# Altium PCB RK839.PcbDoc (part 1 of 3)
Units mm, origin at the board's own origin, x right, y up, seen from the top; angles counter-clockwise.
Board outline 303.12 x 189.36 mm, 2 copper layers (TopLayer, BottomLayer); 307 components, 971 nets, 714 pads, 1012 vias.
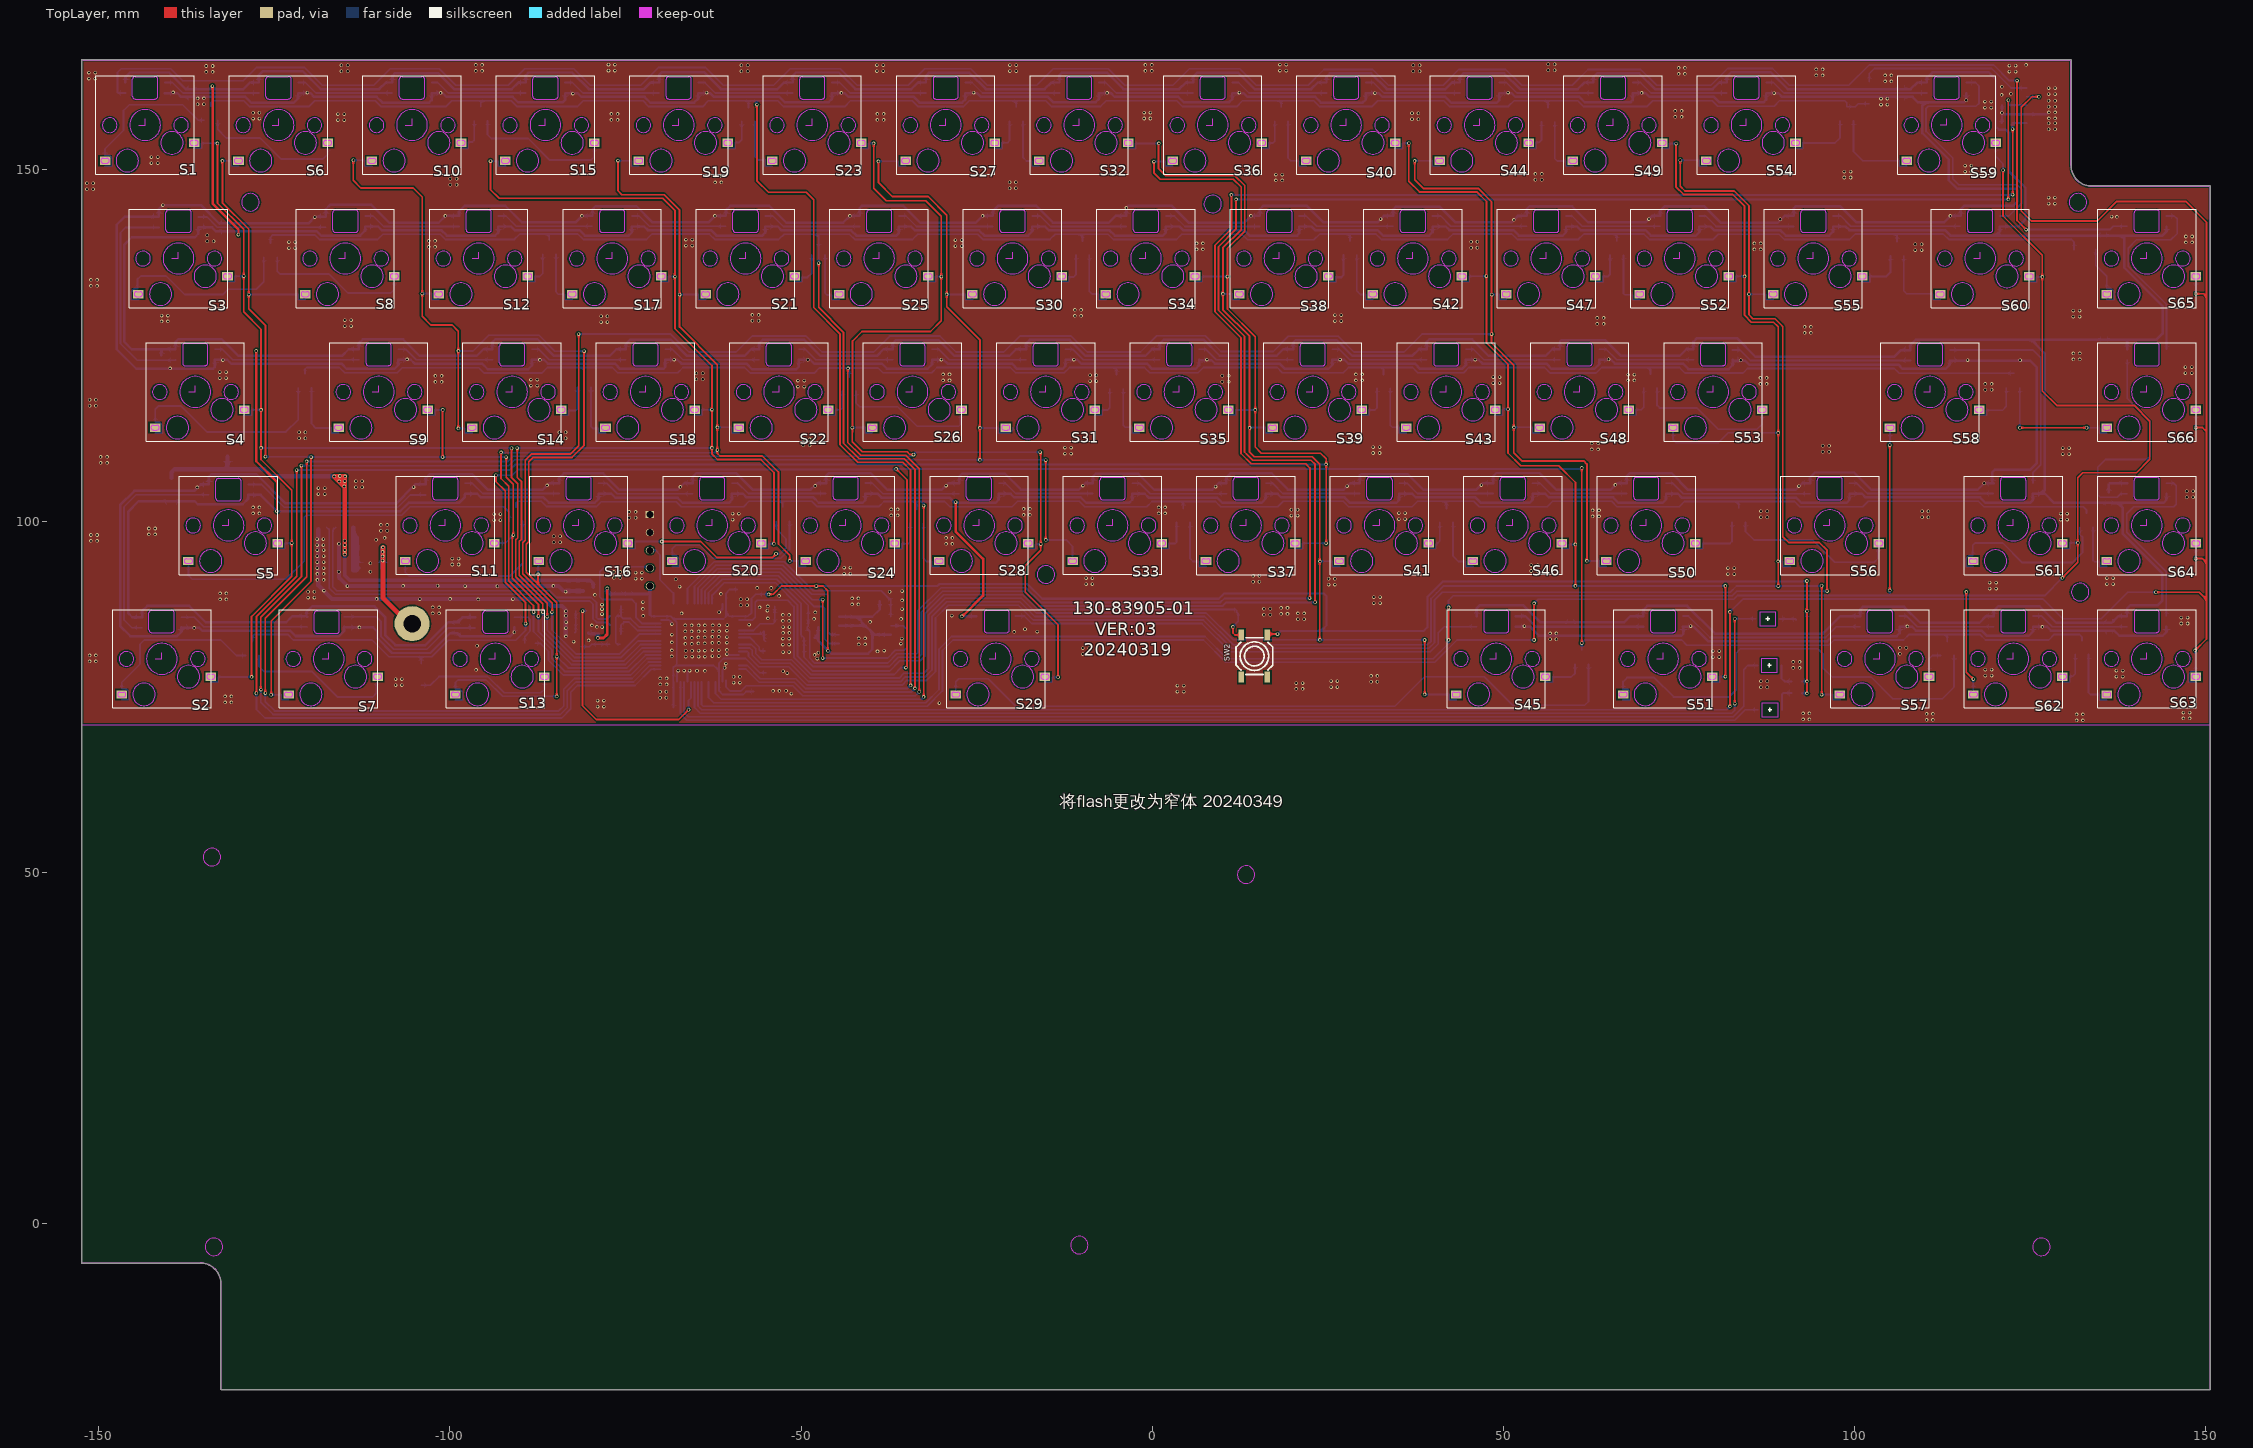
[diagram p0: TopLayer view]
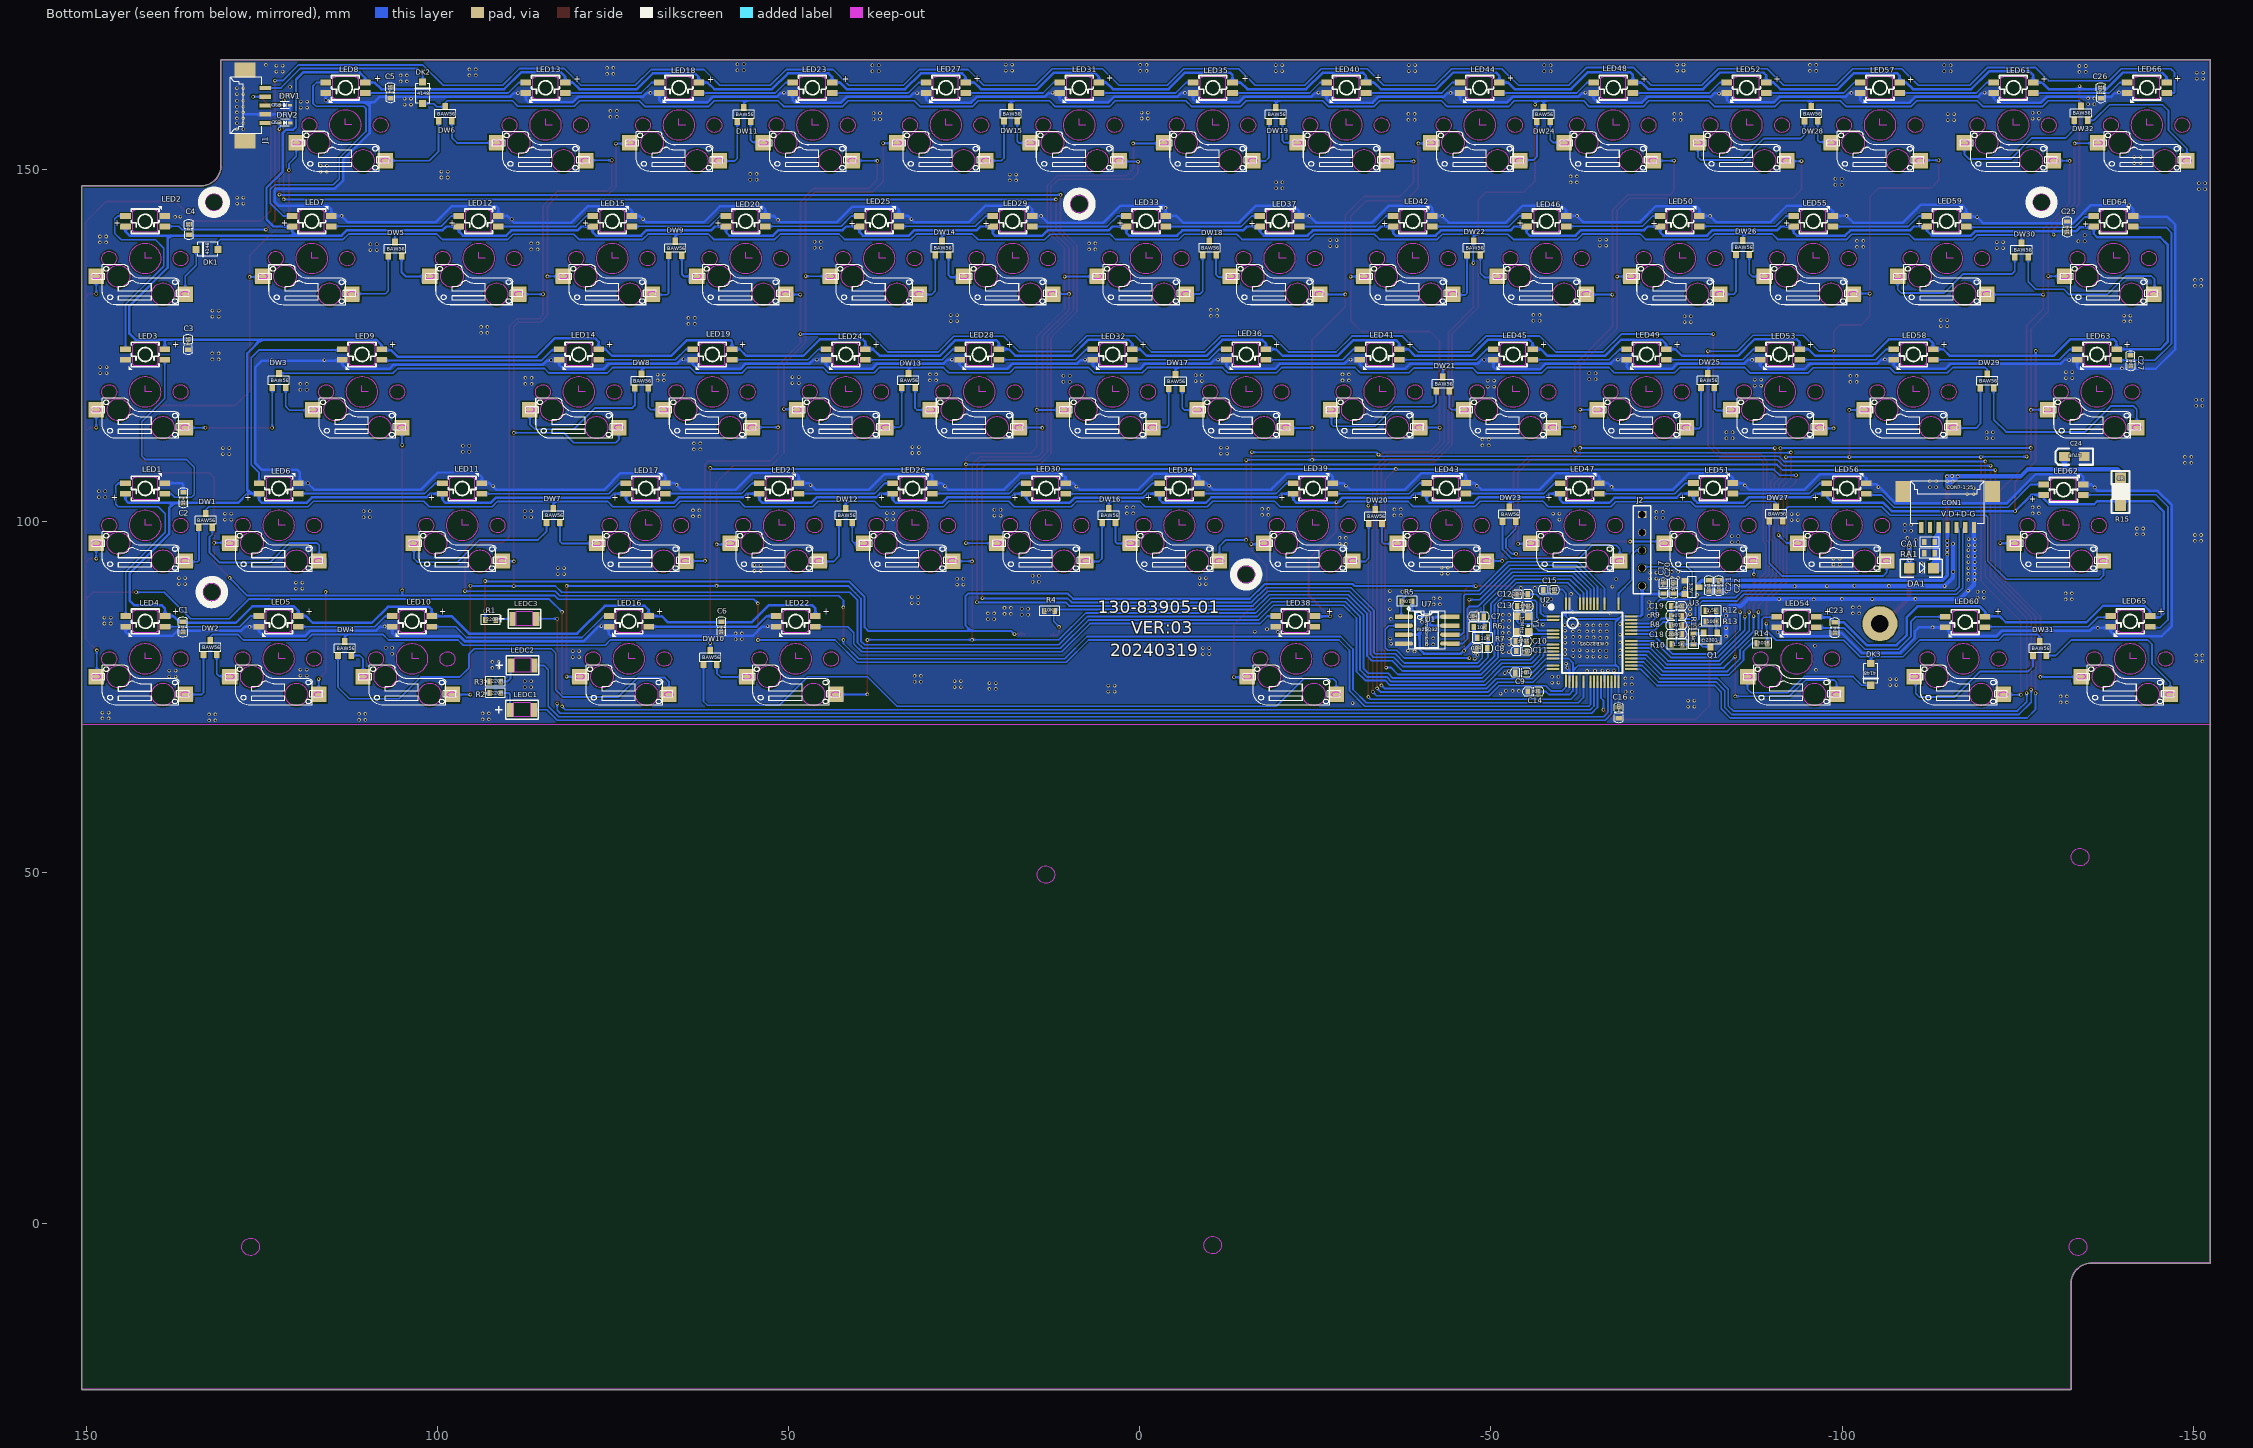
[diagram p1: BottomLayer view, seen from below]

## Layer stack, top to bottom
TopSolder: solder mask 0.0102, Solder Resist, Dk 3.5
TopLayer: signal copper 0.0356
Dielectric1: core 0.32, FR-4, Dk 4.8
BottomLayer: signal copper 0.0356
BottomSolder: solder mask 0.0102, Solder Resist, Dk 3.5

## Board outline
-152.394,-5.651 -135.553,-5.651 cw(c-135.553,-8.588) -132.617,-8.588 ccw(c-132.553,-8.588) -132.617,-8.588 -132.617,-23.578 ccw(c-132.553,-23.578) -132.553,-23.642 150.599,-23.642 ccw(c150.599,-23.578) 150.663,-23.578 150.663,71.036 150.663,147.66 ccw(c150.599,147.66) 150.599,147.724 133.758,147.724 cw(c133.758,150.66) 130.822,150.66 ccw(c130.758,150.66) 130.822,150.66 130.822,165.651 ccw(c130.758,165.651) 130.758,165.714 -152.394,165.714 ccw(c-152.394,165.651) -152.457,165.651 -152.457,71.036 ccw(c-152.394,71.036) -152.457,71.036 cw(c-152.394,71.036) -152.457,71.036 cw(c-152.394,71.036) -152.457,71.037 -152.457,71.036 -152.457,-5.588 ccw(c-152.394,-5.588)

## Design rules (kind name [scope] priority, off if disabled: settings)
Clearance Clearance_2 [All] p1: gap=0.2 ignorepadtopadclearanceinfootprint=FALSE
FabricationTestPointUsage TestPointUsage [All] p1: valid=0 allowmultiple=FALSE
FabricationTestpoint Testpoint [All] p1: side=3 testpointundercomponent=TRUE minsize=1.016 maxsize=2.54 preferedsize=1.524 minholesize=0.508 maxholesize=1.016 preferedholesize=0.813 testpointgrid=0.025 allowsidetop=TRUE allowsidebottom=TRUE usegrid=TRUE gridtolerance=0
NetAntennae [All] p1: netantennaetolerance=0.1
PolygonConnect PolygonConnect_1 [All] p1: connectstyle=Direct reliefconductorwidth=0.4 reliefentries=4 polygonreliefangle="90 Angle" airgapwidth=0.254
RoutingVias [All] p1: holewidth=0.3 width=0.5 viastyle="Through Hole" minholewidth=0.1 minwidth=0.1 maxholewidth=2 maxwidth=2
SolderMaskExpansion [All] p1: expansion=0.102
UnRoutedNet [All] p1: checkbadconnections=TRUE
Width [All] p1: maxlimit=2 minlimit=0.25 preferedwidth=0.25
26 further rules are at their usual default settings.

## Components (designator, comment, footprint, x,y, rotation, side; value= is the part's Value field where it differs from the comment)
@1 "FPAD_1" FPAD_1 -228.674,-368.184 r270 top locked
@2 "FPAD_1" FPAD_1 -228.674,-368.176 r270 top locked
@3 "FPAD_1" FPAD_1 -228.674,-366.076 r270 top locked
@4 "FPAD_1" FPAD_1 -228.674,-366.076 r270 top locked
@5 "FPAD_1" FPAD_1 -228.628,-384.706 r270 top locked
@6 "FPAD_1" FPAD_1 -228.628,-384.698 r270 top locked
@7 "FPAD_1" FPAD_1 -228.628,-382.598 r270 top locked
@8 "FPAD_1" FPAD_1 -228.628,-382.598 r270 top locked
@9 "FPAD_1" FPAD_1 -228.506,-400.044 r270 top locked
@10 "FPAD_1" FPAD_1 -228.506,-400.035 r270 top locked
@11 "FPAD_1" FPAD_1 -228.506,-397.935 r270 top locked
@12 "FPAD_1" FPAD_1 -228.506,-397.935 r270 top locked
@13 "FPAD_1" FPAD_1 -228.502,-351.984 r270 top locked
@14 "FPAD_1" FPAD_1 -228.502,-351.975 r270 top locked
@15 "FPAD_1" FPAD_1 -228.502,-349.875 r270 top locked
@16 "FPAD_1" FPAD_1 -228.502,-349.875 r270 top locked
@17 "FPAD_1" FPAD_1 -228.448,-416.529 r270 top locked
@18 "FPAD_1" FPAD_1 -228.448,-416.521 r270 top locked
@19 "FPAD_1" FPAD_1 -228.448,-414.421 r270 top locked
@20 "FPAD_1" FPAD_1 -228.448,-414.421 r270 top locked
@21 "FPAD_1" FPAD_1 -226.595,-368.184 r270 top locked
@22 "FPAD_1" FPAD_1 -226.574,-368.176 r270 top locked
@23 "FPAD_1" FPAD_1 -226.574,-366.076 r270 top locked
@24 "FPAD_1" FPAD_1 -226.574,-366.076 r270 top locked
@25 "FPAD_1" FPAD_1 -226.549,-384.706 r270 top locked
@26 "FPAD_1" FPAD_1 -226.528,-384.698 r270 top locked
@27 "FPAD_1" FPAD_1 -226.528,-382.598 r270 top locked
@28 "FPAD_1" FPAD_1 -226.528,-382.598 r270 top locked
@29 "FPAD_1" FPAD_1 -226.427,-400.044 r270 top locked
@30 "FPAD_1" FPAD_1 -226.424,-351.984 r270 top locked
@31 "FPAD_1" FPAD_1 -226.406,-400.035 r270 top locked
@32 "FPAD_1" FPAD_1 -226.406,-397.935 r270 top locked
@33 "FPAD_1" FPAD_1 -226.406,-397.935 r270 top locked
@34 "FPAD_1" FPAD_1 -226.402,-351.975 r270 top locked
@35 "FPAD_1" FPAD_1 -226.402,-349.875 r270 top locked
@36 "FPAD_1" FPAD_1 -226.402,-349.875 r270 top locked
@37 "FPAD_1" FPAD_1 -226.369,-416.529 r270 top locked
@38 "FPAD_1" FPAD_1 -226.348,-416.521 r270 top locked
@39 "FPAD_1" FPAD_1 -226.348,-414.421 r270 top locked
@40 "FPAD_1" FPAD_1 -226.348,-414.421 r270 top locked
@41 "FPAD_1" FPAD_1 113.329,-399.076 r270 top locked
@42 "FPAD_1" FPAD_1 113.329,-399.068 r270 top locked
@43 "FPAD_1" FPAD_1 113.329,-396.968 r270 top locked
@44 "FPAD_1" FPAD_1 113.329,-396.968 r270 top locked
@45 "FPAD_1" FPAD_1 113.333,-367.252 r270 top locked
@46 "FPAD_1" FPAD_1 113.333,-367.244 r270 top locked
@47 "FPAD_1" FPAD_1 113.333,-365.144 r270 top locked
@48 "FPAD_1" FPAD_1 113.333,-365.144 r270 top locked
@49 "FPAD_1" FPAD_1 113.366,-415.586 r270 top locked
@50 "FPAD_1" FPAD_1 113.366,-415.578 r270 top locked
@51 "FPAD_1" FPAD_1 113.366,-413.478 r270 top locked
@52 "FPAD_1" FPAD_1 113.366,-413.478 r270 top locked
@53 "FPAD_1" FPAD_1 113.379,-383.774 r270 top locked
@54 "FPAD_1" FPAD_1 113.379,-383.765 r270 top locked
@55 "FPAD_1" FPAD_1 113.379,-381.665 r270 top locked
@56 "FPAD_1" FPAD_1 113.379,-381.665 r270 top locked
@57 "FPAD_1" FPAD_1 113.505,-351.051 r270 top locked
@58 "FPAD_1" FPAD_1 113.505,-351.043 r270 top locked
@59 "FPAD_1" FPAD_1 113.505,-348.943 r270 top locked
@60 "FPAD_1" FPAD_1 113.505,-348.943 r270 top locked
@61 "FPAD_1" FPAD_1 115.408,-399.076 r270 top locked
@62 "FPAD_1" FPAD_1 115.412,-367.252 r270 top locked
@63 "FPAD_1" FPAD_1 115.429,-399.068 r270 top locked
@64 "FPAD_1" FPAD_1 115.429,-396.968 r270 top locked
@65 "FPAD_1" FPAD_1 115.429,-396.968 r270 top locked
@66 "FPAD_1" FPAD_1 115.433,-367.244 r270 top locked
@67 "FPAD_1" FPAD_1 115.433,-365.144 r270 top locked
@68 "FPAD_1" FPAD_1 115.433,-365.144 r270 top locked
@69 "FPAD_1" FPAD_1 115.444,-415.586 r270 top locked
@70 "FPAD_1" FPAD_1 115.458,-383.774 r270 top locked
@71 "FPAD_1" FPAD_1 115.466,-415.578 r270 top locked
@72 "FPAD_1" FPAD_1 115.466,-413.478 r270 top locked
@73 "FPAD_1" FPAD_1 115.466,-413.478 r270 top locked
@74 "FPAD_1" FPAD_1 115.479,-383.765 r270 top locked
@75 "FPAD_1" FPAD_1 115.479,-381.665 r270 top locked
@76 "FPAD_1" FPAD_1 115.479,-381.665 r270 top locked
@77 "FPAD_1" FPAD_1 115.583,-351.051 r270 top locked
@78 "FPAD_1" FPAD_1 115.605,-351.043 r270 top locked
@79 "FPAD_1" FPAD_1 115.605,-348.943 r270 top locked
@80 "FPAD_1" FPAD_1 115.605,-348.943 r270 top locked
C1 "104" 0603C#1 136.231,84.925 r270 bottom locked
C2 "104" 0603C#1 136.15,103.325 r270 bottom locked
C3 "104" 0603C#1 135.5,125.151 r90 bottom locked
C4 "104" 0603C#1 135.375,141.525 r90 bottom locked
C5 "104" 0603C#1 106.675,160.988 r90 bottom locked
C6 "104" 0603C#1 59.55,84.94 r270 bottom
C7 "104" 0603C#1 -48.251,86.393 r180 bottom locked
C8 "104" 0603C#1 -48.751,81.893 r180 bottom locked
C9 "104" 0603C#2 -54.238,78.425 r0 bottom locked
C10 "10pF" 0603C#1 -54.325,82.9 r180 bottom locked
C11 "104" 0603C#1 -54.35,81.5 r0 bottom locked
C12 "104" 0603C#1 -54.5,89.575 r180 bottom locked
C13 "10pF" 0603C#1 -54.525,87.875 r0 bottom locked
C14 "104" 0603C#1 -56.013,75.725 r180 bottom locked
C15 "104" 0603C#1 -58.25,90.2 r0 bottom locked
C16 "104" 0603C#1 -68.2,72.713 r90 bottom locked
C17 "104" 0603C#1 -74.56,90.46 r90 bottom locked
C18 "20PF" 0603C#1 -76.417,83.89 r0 bottom locked
C19 "20PF" 0603C#1 -76.417,87.9 r0 bottom locked
C20 "10UF" 0603C#1 -76,90.48 r90 bottom locked
C21 "104" 0603C#1 -81.05,90.8 r90 bottom locked
C22 "10UF" 0603C#1 -82.45,90.8 r90 bottom locked
C23 "104" 0603C#1 -98.95,84.825 r270 bottom locked
C24 "47UF" CAP-SMT-3216-1 -133.075,109.175 r0 bottom locked
C25 "104" 0603C#1 -132.075,141.9 r270 bottom locked
C26 "104" 0603C#1 -136.85,160.975 r90 bottom locked
C27 "104" 0603C#1 -141.075,122.825 r270 bottom locked
CA1 "103" 0603R/2 -112.452,97.029 r180 bottom locked
CON1 "CON7-1.25" "1.25MM 7PIN" -115.025,99.1 r180 bottom locked
DA1 "SS14" D1206 -113,93.3 r0 bottom locked
DK1 "4148" SOD123-A 132.8,138.675 r90 bottom locked
DK2 "4148" SOD123-A 102.1,161 r180 bottom locked
DK3 "4148" SOD123-A -104.1,78.175 r0 bottom locked
DRV1 "ESD" SOD-523_L1.2-W0.8-LS1.6-BI 121.725,159.225 r0 bottom locked
DRV2 "ESD" SOD-523_L1.2-W0.8-LS1.6-BI 121.7,156.7 r0 bottom locked
DW1 "BAW56" SOT-23#1 133,100.12 r0 bottom locked
DW2 "BAW56" SOT-23#1 132.35,82 r0 bottom locked
DW3 "BAW56" SOT-23#1 122.55,120 r0 bottom locked
DW4 "BAW56" SOT-23#1 113.195,81.875 r0 bottom locked
DW5 "BAW56" SOT-23#1 106.025,138.775 r0 bottom locked
DW6 "BAW56" SOT-23#1 98.875,158 r0 bottom locked
DW7 "BAW56" SOT-23#1 83.5,100.825 r0 bottom locked
DW8 "BAW56" SOT-23#1 70.925,119.95 r0 bottom locked
DW9 "BAW56" SOT-23#1 66.125,138.85 r0 bottom locked
DW10 "BAW56" SOT-23#1 61.15,80.6 r0 bottom locked
DW11 "BAW56" SOT-23#1 56.35,157.875 r0 bottom locked
DW12 "BAW56" SOT-23#1 41.875,100.8 r0 bottom locked
DW13 "BAW56" SOT-23#1 32.925,120 r0 bottom locked
DW14 "BAW56" SOT-23#1 28.15,138.875 r0 bottom locked
DW15 "BAW56" SOT-23#1 18.375,157.95 r0 bottom locked
DW16 "BAW56" SOT-23#1 4.4,100.8 r0 bottom locked
DW17 "BAW56" SOT-23#1 -5.1,119.85 r0 bottom locked
DW18 "BAW56" SOT-23#1 -9.925,138.875 r0 bottom locked
DW19 "BAW56" SOT-23#1 -19.375,157.925 r0 bottom locked
DW20 "BAW56" SOT-23#1 -33.55,100.65 r0 bottom locked
DW21 "BAW56" SOT-23#1 -43.15,119.525 r0 bottom locked
DW22 "BAW56" SOT-23#1 -47.55,138.9 r0 bottom locked
DW23 "BAW56" SOT-23#1 -52.6,100.975 r0 bottom locked
DW24 "BAW56" SOT-23#1 -57.5,157.9 r0 bottom locked
DW25 "BAW56" SOT-23#1 -80.875,120.025 r0 bottom locked
DW26 "BAW56" SOT-23#1 -85.85,138.975 r0 bottom locked
DW27 "BAW56" SOT-23#1 -90.601,101.026 r0 bottom locked
DW28 "BAW56" SOT-23#1 -95.6,158 r0 bottom locked
DW29 "BAW56" SOT-23#1 -120.65,119.975 r0 bottom locked
DW30 "BAW56" SOT-23#1 -125.55,138.575 r0 bottom locked
DW31 "BAW56" SOT-23#1 -128.13,81.875 r0 bottom locked
DW32 "BAW56" SOT-23#1 -134.025,158.075 r0 bottom locked
J1 "5P" RGBC6 124.5,159.175 r90 bottom locked
J2 "SIP5_2.54" SIP5_2.54 -71.525,100.92 r270 bottom locked
LED1 "Comment" 3528反贴幻彩RGB-2.5mA 141.6,104.65 r0 bottom locked
LED2 "Comment" 3528反贴幻彩RGB-2.5mA 141.6,142.7 r0 bottom locked
LED3 "Comment" 3528反贴幻彩RGB-2.5mA 141.6,123.725 r180 bottom locked
LED4 "Comment" 3528反贴幻彩RGB-2.5mA 141.575,85.725 r180 bottom locked
LED5 "Comment" 3528反贴幻彩RGB-2.5mA 122.589,85.725 r180 bottom locked
LED6 "Comment" 3528反贴幻彩RGB-2.5mA 122.58,104.65 r0 bottom locked
LED7 "Comment" 3528反贴幻彩RGB-2.5mA 117.875,142.7 r0 bottom locked
LED8 "Comment" 3528反贴幻彩RGB-2.5mA 113.094,161.7 r180 bottom locked
LED9 "Comment" 3528反贴幻彩RGB-2.5mA 110.723,123.725 r180 bottom locked
LED10 "Comment" 3528反贴幻彩RGB-2.5mA 103.598,85.725 r180 bottom locked
LED11 "Comment" 3528反贴幻彩RGB-2.5mA 96.465,104.65 r0 bottom locked
LED12 "Comment" 3528反贴幻彩RGB-2.5mA 94.125,142.7 r0 bottom locked
LED13 "Comment" 3528反贴幻彩RGB-2.5mA 84.599,161.7 r180 bottom locked
LED14 "Comment" 3528反贴幻彩RGB-2.5mA 79.843,123.725 r180 bottom locked
LED15 "Comment" 3528反贴幻彩RGB-2.5mA 75.1,142.7 r0 bottom locked
LED16 "Comment" 3528反贴幻彩RGB-2.5mA 72.725,85.725 r180 bottom locked
LED17 "Comment" 3528反贴幻彩RGB-2.5mA 70.337,104.65 r0 bottom locked
LED18 "Comment" 3528反贴幻彩RGB-2.5mA 65.589,161.7 r180 bottom locked
LED19 "Comment" 3528反贴幻彩RGB-2.5mA 60.848,123.725 r180 bottom locked
LED20 "Comment" 3528反贴幻彩RGB-2.5mA 56.1,142.7 r0 bottom locked
LED21 "Comment" 3528反贴幻彩RGB-2.5mA 51.339,104.65 r0 bottom locked
LED22 "Comment" 3528反贴幻彩RGB-2.5mA 48.975,85.725 r180 bottom locked
LED23 "Comment" 3528反贴幻彩RGB-2.5mA 46.599,161.7 r180 bottom locked
LED24 "Comment" 3528反贴幻彩RGB-2.5mA 41.843,123.725 r180 bottom locked
LED25 "Comment" 3528反贴幻彩RGB-2.5mA 37.1,142.7 r0 bottom locked
LED26 "Comment" 3528反贴幻彩RGB-2.5mA 32.35,104.65 r0 bottom locked
LED27 "Comment" 3528反贴幻彩RGB-2.5mA 27.599,161.7 r180 bottom locked
LED28 "Comment" 3528反贴幻彩RGB-2.5mA 22.84,123.725 r180 bottom locked
LED29 "Comment" 3528反贴幻彩RGB-2.5mA 18.1,142.7 r0 bottom locked
LED30 "Comment" 3528反贴幻彩RGB-2.5mA 13.35,104.65 r0 bottom locked
LED31 "Comment" 3528反贴幻彩RGB-2.5mA 8.599,161.7 r180 bottom locked
LED32 "Comment" 3528反贴幻彩RGB-2.5mA 3.853,123.725 r180 bottom locked
LED33 "Comment" 3528反贴幻彩RGB-2.5mA -0.9,142.7 r0 bottom locked
LED34 "Comment" 3528反贴幻彩RGB-2.5mA -5.65,104.65 r0 bottom locked
LED35 "Comment" 3528反贴幻彩RGB-2.5mA -10.412,161.7 r180 bottom locked
LED36 "Comment" 3528反贴幻彩RGB-2.5mA -15.16,123.725 r180 bottom locked
LED37 "Comment" 3528反贴幻彩RGB-2.5mA -19.9,142.7 r0 bottom locked
LED38 "Comment" 3528反贴幻彩RGB-2.5mA -22.15,85.725 r180 bottom locked
LED39 "Comment" 3528反贴幻彩RGB-2.5mA -24.675,104.65 r0 bottom locked
LED40 "Comment" 3528反贴幻彩RGB-2.5mA -29.421,161.7 r180 bottom locked
LED41 "Comment" 3528反贴幻彩RGB-2.5mA -34.157,123.725 r180 bottom locked
LED42 "Comment" 3528反贴幻彩RGB-2.5mA -38.875,142.7 r0 bottom locked
LED43 "Comment" 3528反贴幻彩RGB-2.5mA -43.65,104.675 r0 bottom locked
LED44 "Comment" 3528反贴幻彩RGB-2.5mA -48.416,161.7 r180 bottom locked
LED45 "Comment" 3528反贴幻彩RGB-2.5mA -53.154,123.725 r180 bottom locked
LED46 "Comment" 3528反贴幻彩RGB-2.5mA -57.9,142.7 r0 bottom locked
LED47 "Comment" 3528反贴幻彩RGB-2.5mA -62.66,104.65 r0 bottom locked
LED48 "Comment" 3528反贴幻彩RGB-2.5mA -67.426,161.7 r180 bottom locked
LED49 "Comment" 3528反贴幻彩RGB-2.5mA -72.157,123.725 r180 bottom locked
LED50 "Comment" 3528反贴幻彩RGB-2.5mA -76.9,142.7 r0 bottom locked
LED51 "Comment" 3528反贴幻彩RGB-2.5mA -81.65,104.675 r0 bottom locked
LED52 "Comment" 3528反贴幻彩RGB-2.5mA -86.401,161.7 r180 bottom locked
LED53 "Comment" 3528反贴幻彩RGB-2.5mA -91.147,123.725 r180 bottom locked
LED54 "Comment" 3528反贴幻彩RGB-2.5mA -93.5,85.65 r180 bottom locked
LED55 "Comment" 3528反贴幻彩RGB-2.5mA -95.9,142.7 r0 bottom locked
LED56 "Comment" 3528反贴幻彩RGB-2.5mA -100.65,104.65 r0 bottom locked
LED57 "Comment" 3528反贴幻彩RGB-2.5mA -105.401,161.7 r180 bottom locked
LED58 "Comment" 3528反贴幻彩RGB-2.5mA -110.157,123.725 r180 bottom locked
LED59 "Comment" 3528反贴幻彩RGB-2.5mA -114.875,142.7 r0 bottom locked
LED60 "Comment" 3528反贴幻彩RGB-2.5mA -117.525,85.625 r180 bottom locked
LED61 "Comment" 3528反贴幻彩RGB-2.5mA -124.401,161.7 r180 bottom locked
LED62 "Comment" 3528反贴幻彩RGB-2.5mA -131.531,104.476 r0 bottom locked
LED63 "Comment" 3528反贴幻彩RGB-2.5mA -136.277,123.725 r180 bottom locked
LED64 "Comment" 3528反贴幻彩RGB-2.5mA -138.636,142.7 r0 bottom locked
LED65 "Comment" 3528反贴幻彩RGB-2.5mA -141.05,85.725 r180 bottom locked
LED66 "Comment" 3528反贴幻彩RGB-2.5mA -143.4,161.7 r180 bottom locked
LEDC1 "" 1206LED 87.94,73.136 r0 bottom locked
LEDC2 "" 1206LED 87.864,79.461 r0 bottom locked
LEDC3 "" 1206LED 87.61,86.09 r0 bottom locked
Q1 "2301" SOT-23#2 -81.267,83.1 r180 bottom locked
R1 "220R" RES-SMT-0603-1 92.425,85.94 r180 bottom locked
R2 "220R" RES-SMT-0603-1 91.75,75.525 r180 bottom locked
R3 "220R" RES-SMT-0603-1 91.75,77.175 r180 bottom locked
R4 "10K" RES-SMT-0603-1 12.825,87.2 r0 bottom locked
R5 "10K" RES-SMT-0603-1 -38.05,88.575 r0 bottom locked
R6 "10K" RES-SMT-0603-2 -48.35,84.925 r0 bottom locked
R7 "10K" RES-SMT-0603-2 -48.83,83.38 r0 bottom locked
R8 "10R" 0603R#1 -76.417,85.19 r0 bottom locked
R9 "10R" 0603R#1 -76.417,86.51 r0 bottom locked
R10 "1.5K" RES-SMT-0603-1 -76.517,82.47 r0 bottom locked
R11 "NC" RES-SMT-0603-1 -78.842,83.2 r90 bottom locked
R12 "1.5K" RES-SMT-0603-1 -81.317,87.25 r0 bottom locked
R13 "100K" RES-SMT-0603-1 -81.342,85.7 r180 bottom locked
R14 "300R" RES-SMT-0603-1 -88.592,82.625 r180 bottom locked
R15 "0R" 1206RJ -139.675,106.125 r270 bottom locked
RA1 "1M" 0603R#2 -112.45,95.45 r0 bottom locked
S1 "SW-L" SW-RBUY -143.407,156.372 r0 top locked
S2 "SW-L" SW-RBUY -141.025,80.375 r0 top locked
S3 "SW-L" SW-RBUY -138.655,137.376 r0 top locked
S4 "SW-L" SW-RBUY -136.271,118.375 r0 top locked
S5 "SW-L" SW-RBUY -131.527,99.374 r0 top locked
S6 "SW-L" SW-RBUY -124.408,156.372 r0 top locked
S7 "SW-L" SW-RBUY -117.275,80.375 r0 top locked
S8 "SW-L" SW-RBUY -114.905,137.376 r0 top locked
S9 "SW-L" SW-RBUY -110.151,118.377 r0 top locked
S10 "SW-L" SW-RBUY -105.408,156.373 r0 top locked
S11 "SW-L" SW-RBUY -100.657,99.376 r0 top locked
S12 "SW-L" SW-RBUY -95.904,137.374 r0 top locked
S13 "SW-L" SW-RBUY -93.525,80.375 r0 top locked
S14 "SW-L" SW-RBUY -91.151,118.377 r0 top locked
S15 "SW-L" SW-RBUY -86.408,156.372 r0 top locked
S16 "SW-L" SW-RBUY -81.657,99.374 r0 top locked
S17 "SW-L" SW-RBUY -76.905,137.375 r0 top locked
S18 "SW-L" SW-RBUY -72.151,118.375 r0 top locked
S19 "SW-L" SW-RBUY -67.418,156.372 r0 top locked
S20 "SW-L" SW-RBUY -62.657,99.376 r0 top locked
S21 "SW-L" SW-RBUY -57.908,137.375 r0 top locked
S22 "SW-L" SW-RBUY -53.153,118.374 r0 top locked
S23 "SW-L" SW-RBUY -48.418,156.372 r0 top locked
S24 "SW-L" SW-RBUY -43.659,99.374 r0 top locked
S25 "SW-L" SW-RBUY -38.905,137.375 r0 top locked
S26 "SW-L" SW-RBUY -34.151,118.377 r0 top locked
S27 "SW-L" SW-RBUY -29.418,156.372 r0 top locked
S28 "SW-L" SW-RBUY -24.657,99.376 r0 top locked
S29 "SW-L" SW-RBUY -22.275,80.375 r0 top locked
S30 "SW-L" SW-RBUY -19.908,137.375 r0 top locked
S31 "SW-L" SW-RBUY -15.164,118.375 r0 top locked
S32 "SW-L" SW-RBUY -10.408,156.372 r0 top locked
S33 "SW-L" SW-RBUY -5.657,99.376 r0 top locked
S34 "SW-L" SW-RBUY -0.905,137.377 r0 top locked
S35 "SW-L" SW-RBUY 3.849,118.377 r0 top locked
S36 "SW-L" SW-RBUY 8.592,156.372 r0 top locked
S37 "SW-L" SW-RBUY 13.343,99.375 r0 top locked
S38 "SW-L" SW-RBUY 18.092,137.375 r0 top locked
S39 "SW-L" SW-RBUY 22.836,118.375 r0 top locked
S40 "SW-L" SW-RBUY 27.592,156.372 r0 top locked
S41 "SW-L" SW-RBUY 32.344,99.374 r0 top locked
S42 "SW-L" SW-RBUY 37.095,137.375 r0 top locked
S43 "SW-L" SW-RBUY 41.849,118.377 r0 top locked
S44 "SW-L" SW-RBUY 46.592,156.372 r0 top locked
S45 "SW-L" SW-RBUY 48.975,80.375 r0 top locked
S46 "SW-L" SW-RBUY 51.343,99.376 r0 top locked
S47 "SW-L" SW-RBUY 56.095,137.375 r0 top locked
S48 "SW-L" SW-RBUY 60.849,118.375 r0 top locked
S49 "SW-L" SW-RBUY 65.592,156.372 r0 top locked
S50 "SW-L" SW-RBUY 70.341,99.374 r0 top locked
S51 "SW-L" SW-RBUY 72.725,80.375 r0 top locked
S52 "SW-L" SW-RBUY 75.095,137.377 r0 top locked
S53 "SW-L" SW-RBUY 79.849,118.377 r0 top locked
S54 "SW-L" SW-RBUY 84.592,156.372 r0 top locked
S55 "SW-L" SW-RBUY 94.095,137.377 r0 top locked
S56 "SW-L" SW-RBUY 96.459,99.374 r0 top locked
S57 "SW-L" SW-RBUY 103.6,80.375 r0 top locked
S58 "SW-L" SW-RBUY 110.729,118.375 r0 top locked
S59 "SW-L" SW-RBUY 113.092,156.374 r0 top locked
S60 "SW-L" SW-RBUY 117.866,137.367 r0 top locked
S61 "SW-L" SW-RBUY 122.59,99.374 r0 top locked
S62 "SW-L" SW-RBUY 122.6,80.375 r0 top locked
S63 "SW-L" SW-RBUY 141.592,80.374 r0 top locked
S64 "SW-L" SW-RBUY 141.592,99.374 r0 top locked
S65 "SW-L" SW-RBUY 141.592,137.374 r0 top locked
S66 "SW-L" SW-RBUY 141.597,118.374 r0 top locked
SW2 "SW_55" SW_55 14.536,80.783 r90 top locked
U1 "W25Q32" SOIC8_208 -40.925,84.475 r270 bottom locked
U2 "WB32Q95" "LQFP64 10x10_N" -64.43,82.69 r270 bottom locked
U3 "3.3V" SOT-23#2 -78.62,90.58 r90 bottom locked
U7 "ZB25VQ80ASIG" SOP8W -40.855,84.476 r270 bottom
Y1 "12MHz" Y3225 -55.3,84.3 r0 bottom locked

## Footprints (in the part's own frame and the unit in brackets; to place one, negate y for a bottom-side part, rotate by r counter-clockwise, add the part's x,y. Pads: shape width x height; smd on the part's side, far side on the other; paste and mask are expansions set on the pad)
"1.25MM 7PIN" [mm]
  rect 0.6x1.6 smd: 1(3.75,0) 2(2.5,0) 3(1.25,0) 4(0,0) 5(-1.25,0) 6(-2.5,0) 7(-3.75,0)
  rect 2.1x3 smd: A(6.38,5.14) B(-6.4,5.14)
  silkscreen extent -5.25,0.5 5.25,6.6
0603C#1 [mil]
  rect 25x35 smd: 1(-30,0) 2(30,0)
  silkscreen extent -57,-25 58,25
0603C#2 [mil]
  rect 25x27.56 smd: 1(-30,0)
  rect 25x35 smd: 2(30,0)
  silkscreen extent -57,-25 58,25
0603R#1 [mil]
  rect 25x35 smd: 1(-30,0) 2(30,0)
  silkscreen extent -57,-25 58,25
0603R#2 [mil]
  rect 25x35 smd: 1(-29.99,0.67) 2(30.01,0.67)
  silkscreen extent -55,-27 55,28
0603R/2 [mil]
  rect 25x35 smd: 1(-29.6,-0.14) 2(30.4,-0.14)
  silkscreen extent -55,-28 56,27
1206LED [mm]
  rect 0.9x2 smd: 1(-1.702,0) 2(1.702,0)
  KeepOutLayer lines w0.1: -1.15,1 -1.15,-1 1.15,-1 1.15,1 -1.15,1
  silkscreen extent -2.31,-1.35 3.85,1.35
1206RJ [mil]
  rect 60x60 smd: 1(-0.39,-0.68) 2(153.15,-0.68)
  silkscreen extent -40,-51 195,49
3528反贴幻彩RGB-2.5mA [mm] "广东晶宏欣光电有限公司"
  rect 1.5x0.82 smd mask+0.051: 1(2.8,-0.75) 2(-2.8,-0.75) 3(-2.8,0.75) 4(2.8,0.75)
  KeepOutLayer board cut-out: -1.4,-1.6 -1.413,-1.6 -1.409,-1.6 -1.406,-1.6 -1.406,-1.6 -1.403,-1.6 -1.4,-1.6
  KeepOutLayer lines w0.005: -1.8,1.2 cw(c-1.4,1.2) -1.4,1.6 ; -1.8,1.2 cw(c-1.4,1.2) -1.4,1.6 ; -1.8,1.2 -1.8,-1.2 ; -1.8,1.2 -1.8,-1.2 ; -1.8,-1.2 ccw(c-1.4,-1.2) -1.406,-1.6 ; -1.8,-1.2 ccw(c-1.4,-1.2) -1.406,-1.6 ; -1.8,-1.2 -1.8,-1.2 ; -1.8,-1.2 -1.8,-1.2 ; -1.8,-1.2 -1.8,-1.2 ; -1.8,-1.2 -1.8,-1.2 ; -1.413,-1.6 ccw(c-1.413,-1.2) -1.406,-1.6 ; -1.413,-1.6 ccw(c-1.413,-1.2) -1.406,-1.6 ; -1.413,-1.6 -1.4,-1.6 ; -1.413,-1.6 -1.4,-1.6 ; -1.406,-1.6 ccw(c-1.413,-1.2) -1.4,-1.6 ; -1.406,-1.6 ccw(c-1.4,-1.2) -1.4,-1.6 ; -1.406,-1.6 ccw(c-1.413,-1.2) -1.4,-1.6 ; -1.406,-1.6 ccw(c-1.4,-1.2) -1.4,-1.6 ; -1.4,1.6 1.4,1.6 ; -1.4,1.6 1.4,1.6 ; -1.4,-1.6 1.4,-1.6 ; -1.4,-1.6 1.4,-1.6 ; 1.4,1.6 cw(c1.4,1.2) 1.8,1.2 ; 1.4,1.6 cw(c1.4,1.2) 1.8,1.2 ; 1.4,1.6 1.4,1.6 ; 1.4,1.6 1.4,1.6 ; 1.4,-1.6 ccw(c1.4,-1.2) 1.8,-1.2 ; 1.4,-1.6 ccw(c1.4,-1.2) 1.8,-1.2 ; 1.4,-1.6 1.4,-1.6 ; 1.4,-1.6 1.4,-1.6 ; 1.8,1.2 1.8,-1.2 ; 1.8,1.2 1.8,-1.2
  silkscreen extent -2.34,-2.16 1.98,1.75, body extent -2.94,-1.4 2.94,1.41, height 0.8
CAP-SMT-3216-1 [mil] "贴片钽电容 A型-3216"
  rect 60x50 smd: 1(55,0) 2(-55,0)
  silkscreen extent -105,-45 105,45, body extent -67,-35 67,35, height 71
D1206 [mil]
  rect 60x60 smd: 1(-0.57,-0.31) 2(134.43,-0.31)
  silkscreen extent -51,-50 184,50
FPAD_1 [mm]
"LQFP64 10x10_N" [mm] "64脚，体宽10x10mm，脚距0.5mm"
  oval 0.3x1.8 smd: 1(-3.75,-5.575) 2(-3.25,-5.575) 5(-1.75,-5.575) 6(-1.25,-5.575) 7(-0.75,-5.575) 9(0.25,-5.575) 10(0.75,-5.575) 11(1.25,-5.575) 12(1.75,-5.575) 13(2.25,-5.575) 15(3.25,-5.575) 16(3.75,-5.575) 33(3.75,5.55) 34(3.25,5.55) 35(2.75,5.55) 36(2.25,5.55) 37(1.75,5.55) 38(1.25,5.55) 39(0.75,5.55) 40(0.25,5.55) 41(-0.25,5.55) 43(-1.25,5.55) 44(-1.75,5.55) 45(-2.25,5.55) 46(-2.75,5.55) 47(-3.25,5.55) 48(-3.75,5.55)
  oval 0.3x1.8 on Bottom Overlay: 3(-2.75,-5.575) 4(-2.25,-5.575) 8(-0.25,-5.575) 14(2.75,-5.575) 42(-0.75,5.55)
  oval 1.8x0.3 smd: 17(5.39,-3.75) 18(5.55,-3.25) 19(5.55,-2.75) 20(5.55,-2.25) 22(5.55,-1.25) 24(5.55,-0.25) 25(5.55,0.25) 26(5.55,0.75) 27(5.55,1.25) 28(5.55,1.75) 29(5.55,2.25) 30(5.55,2.75) 31(5.55,3.25) 32(5.55,3.75) 49(-5.55,3.75) 53(-5.55,1.75) 55(-5.55,0.75) 56(-5.55,0.25) 57(-5.55,-0.25) 58(-5.55,-0.75) 59(-5.55,-1.25) 60(-5.55,-1.75) 63(-5.55,-3.25) 64(-5.55,-3.75)
  oval 1.8x0.3 on Bottom Overlay: 21(5.55,-1.75) 23(5.55,-0.75) 50(-5.55,3.25) 51(-5.55,2.75) 52(-5.55,2.25) 54(-5.55,1.25) 61(-5.55,-2.25) 62(-5.55,-2.75)
  silkscreen extent -5.33,-6.09 4.32,4.32, body extent -6,-6 6,6, height 1.45
RES-SMT-0603-1 [mil] "厚膜电阻 0603  ±5% 100mW"
  rect 25x35 smd: 1(-30,0) 2(30,0)
  silkscreen extent -55,-27 55,28, body extent -31,-16 32,16, height 20
RES-SMT-0603-2 [mil] "厚膜电阻 0603  ±5% 100mW"
  rect 25x35 smd: 1(-30,0) 2(30,0)
  silkscreen extent -55,-27 55,28, body extent -31,-16 32,16, height 18
RGBC6 [mm]
  rect 0.6x1.6 smd: 1(-2.5,0) 2(-1.25,0) 3(0,0) 4(1.25,0) 5(2.5,0)
  rect 2.1x3 smd: 2(-5.05,2.9) 3(5.05,2.9)
  silkscreen extent -4,0.5 4,5
SIP5_2.54 [mm]
  rect 1x1.2 hole 1: 1(0,0)
  oval 1x1.2 hole 1: 2(2.54,0) 3(5.08,0) 4(7.62,0) 5(10.16,0)
  silkscreen extent -1.27,-1.27 11.29,1.27
SOD123-A [mm]
  rect 1x1 smd: 1(0.014,-1.559) 2(0.014,1.541)
  silkscreen extent -0.98,-1.51 1.02,1.29
SOD-523_L1.2-W0.8-LS1.6-BI [mm]
  rect 0.6x0.4 smd: 1(-0.75,0) 2(0.75,0)
  silkscreen extent -0.65,-0.5 0.65,0.5, body extent -0.8,-0.4 0.8,0.4, height 0.71
SOIC8_208 [mil]
  rect 25x70 smd: 1(-75,-145) 2(-25,-145) 3(25,-145) 4(75,-145) 5(75,145) 6(25,145) 7(-25,145) 8(-75,145)
  silkscreen extent -106,-102 106,102
SOP8W [mm]
  oval 0.62x2.5 smd: 1(-1.905,-3.175) 2(-0.635,-3.175) 3(0.635,-3.175) 4(1.905,-3.175) 5(1.905,3.175) 6(0.635,3.175) 7(-0.635,3.175) 8(-1.905,3.175)
  silkscreen extent -3.22,-2.71 2.53,1.65, body extent -2.64,-3.94 2.64,3.94, height 1.9
SOT-23#1 [mm]
  rect 0.8x1 smd: 1(0,-1) 2(-0.95,1) 3(0.95,1)
  silkscreen extent -1.5,-0.6 1.5,0.6
SOT-23#2 [mm]
  rect 0.8x1 smd: 1(0.95,1) 2(-0.95,1) 3(0,-1)
  silkscreen extent -1.5,-0.6 1.5,0.6
SW-RBUY [mm]
  rect 1.5x1.2 / inner rect 1.5x1.2 / far side rect 2.2x2.2 all layers, no hole: 1(6.984,-2.514) 2(-5.699,-5.054)
  KeepOutLayer circle w0.127: c-2.532,-5.054 r1.6
  KeepOutLayer circle w0.127: c3.818,-2.514 r1.6
  KeepOutLayer circle w0.127: c-5.035,0.004 r1.05
  KeepOutLayer circle w0.127: c5.125,0.004 r1.05
  KeepOutLayer circle w0.1: c0.008,0.026 r2.2
  KeepOutLayer lines w0.1: -5.949,-5.404 cw(c-5.949,-5.054) -5.949,-4.704 -5.449,-4.704 cw(c-5.449,-5.054) -5.449,-5.404 -5.949,-5.404 ; 6.734,-2.864 cw(c6.734,-2.514) 6.734,-2.164 7.234,-2.164 cw(c7.234,-2.514) 7.234,-2.864 6.734,-2.864
  KeepOutLayer lines w0.127: 0.008,0.026 0.008,0.905 0.008,0.026 ; 0.008,0.026 -0.927,0.026 0.008,0.026
  silkscreen extent -6.99,-6.97 7.01,7.03
SW_55 [mm]
  rect 1.58x0.8 smd mask+0.051: 1(-3,1.849) 1/1(-3,-1.85) 2(3,1.85) 2/1(3,-1.85)
  silkscreen extent -2.6,-2.6 2.6,2.6
Y3225 [mm]
  rect 0.9x1 smd: 1(0,0) 2(1.55,-2.15) 3(0,-2.15) 4(1.55,0)
  silkscreen extent -0.55,-2.74 2.1,0.59

## Free pads (board coordinates)
  round 5 hole 2.5: 0(-105.396,85.401)

## Via types
v1: diameter 0.5, hole 0.3, TopLayer to BottomLayer, tented both sides, 1012 vias

## Nets (pads, with @x,y where several pads share a name; then routed paths per layer and width w, separated by ;. In a path a pad name is that pad's centre, name@x,y a point inside that pad or via, vN(x,y) a via of type N, cw(c..) or ccw(c..) an arc to the next point about the centre after c; other vN are vias at no path point)
1: 
2: 
2.4G: 
2.4G/BT: 
2.4G_EN: 
2_4G_LED: 
3: 
3.3V: C9.1 C12.2 C14.2 C15.1 C16.2 C17.1 C20.1 J2.5 Q1.2 R1.1 R2.1 R3.1 R5.1 R6.2 R7.2 R11.2 SW2.2/1 U1.3 U1.7 U1.8 U2.1 U2.13 U2.19 U2.32 U2.48 U2.64 U3.2 U7.3 U7.7 U7.8 | length 312.2
  TopLayer w0.25: v1(-54.625,89.575) -53.975,89.575 -52.79,90.76 v1(-47.85,90.76) -46.885,90.76 -46.2,90.075 v1(-46.2,81.55)
  TopLayer w0.3: SW2.2/1@16.386,83.783 16.528,83.925 v1(17.825,83.925) ; v1(93.187,75.475) 93.2,75.488 v1(93.2,77.175) v1@93.2,87.163 ; v1@93.2,87.2 v1(93.2,91.475) ; v1(93.213,87.163) v1@93.25,87.2
  TopLayer w0.4: v1(-78.95,83.38) -78.12,83.38 -77.6,83.9 v1(-77.6,90.425)
  BottomLayer w0.25: v1@-77.62,90.405 v1(-77.6,90.425) ; -71.322,86.472 -71.29,86.44 U2.48@-69.98,86.44 -68.571,86.44 -68.201,86.07 ; U2.32@-68.205,77.14 -68.205,79.17 -67.925,79.45 ; C16.2@-68.2,73.475 -68.18,73.495 U2.32@-68.18,77.14 ; -60.68,87.249 U2.64@-60.68,88.24 -60.68,89.745 -60.15,90.275 C15.1@-59.112,90.275 ; -60.679,87.249 -60.679,86.949 ; U2.1@-58.855,86.44 -57.585,86.44 -57.05,86.975 -57.05,89 -56.475,89.575 C12.2@-55.262,89.575 v1(-54.625,89.575) ; U2.1@-58.855,86.465 -60.195,86.465 -60.679,86.949 ; C14.2@-56.775,75.725 -57.85,75.725 -58.275,75.3 -61.15,75.3 -61.68,75.83 U2.19@-61.68,77.14 -61.68,78.68 ; C9.1@-55,78.425 -55.875,78.425 -57.89,80.44 U2.13@-58.855,80.44 -61.085,80.44 -61.68,79.845 -61.68,78.68 ; -68.201,86.07 -67.725,85.594 -67.725,79.65 -67.925,79.45 ; -68.201,86.07 -61.05,86.07 -60.679,86.441 -60.679,86.949 ; -67.925,79.45 -62.45,79.45 -61.68,78.68
  BottomLayer w0.3: v1(-47.85,90.76) -30.593,90.76 -30.303,91.05 -17.79,91.05 -15.69,88.95 9.483,88.95 10.233,89.7 24.425,89.7 24.825,89.3 24.825,85.2 23.975,84.35 ; v1(17.825,83.925) 17.875,83.925 18.3,84.35 23.975,84.35 ; R2.1@92.512,75.525 92.562,75.475 v1(93.187,75.475) ; R3.1@92.512,77.175 v1(93.2,77.175) ; R1.1@93.187,85.94 93.187,87.163 v1(93.213,87.163) ; v1(93.2,91.475) 93.15,91.425 41.393,91.425 39.171,89.203 39.171,84.871 38.65,84.35 23.975,84.35
  BottomLayer w0.35: R7.2@-48.068,83.38 -47.588,83.86 ; R6.2@-47.588,84.925 -47.588,83.86 ; U1.7@-44.608,85.11 -40.81,85.11 ; U1.8@-44.608,86.38 -42.08,86.38 ; R5.1@-38.812,88.575 -38.812,87.436 -39.868,86.38 -42.08,86.38 ; U1.3@-37.242,83.84 -39.54,83.84 -39.862,84.162 ; -47.588,83.86 -47.588,83.006 -45.732,81.15 -40.475,81.15 -39.862,81.763 -39.862,84.162 ; -42.08,86.38 -40.81,85.11 ; -40.81,85.11 -39.862,84.162
  BottomLayer w0.4: Q1.2@-80.317,84.1 -80.179,83.962 R11.2@-78.842,83.962 -78.95,83.854 v1(-78.95,83.38) ; v1@-77.62,90.405 U3.2@-77.62,89.63 -71.745,89.63 -71.525,89.85 ; J2.5@-71.525,90.76 -71.525,89.85 ; -71.322,86.472 -71.525,86.675 -71.525,89.85
4: 
5V_EN: 
$$$3: LED10.1 LED16.3 | length 27.2
  BottomLayer w0.25: LED16.3@75.525,86.475 76.35,86.475 79.4,83.425 95.85,83.425 97.4,84.975 LED10.1@100.798,84.975
$$$4: 
$$$5: 
$$$6: 
$$$7: LED22.1 LED38.3 | length 70.2
  BottomLayer w0.25: LED38.3@-19.482,86.475 LED38.3@-19.35,86.475 -18.2,86.475 -17.15,85.425 7.066,85.425 11.091,81.4 39.586,81.4 40.696,82.511 40.696,84.096 41.575,84.975 LED22.1@46.175,84.975
$$$8: 
$$$9: LED54.1 LED60.3 | length 23
  BottomLayer w0.25: LED60.3@-115.075,86.375 -110.5,86.375 -109.8,85.675 -109.8,83.562 -108.014,81.776 -103.261,81.776 -100.237,84.8 LED54.1@-96.425,84.8
$$$10: LED62.3 LED65.1 | length 31.9
  BottomLayer w0.25: LED65.1@-143.84,84.81 -145.27,84.81 -146.4,85.94 -146.4,102.05 -144.691,103.759 LED62.3@-134.364,103.759
$$$14: LED43.3 LED47.1 | length 14
  BottomLayer w0.25: LED47.1@-59.86,105.4 -59,105.4 -57.533,103.933 LED43.3@-46.493,103.933
$$$18: LED26.3 LED30.1 | length 14
  BottomLayer w0.25: LED30.1@16.15,105.4 17.125,105.4 18.592,103.933 LED26.3@29.517,103.933
$$$20: LED17.3 LED21.1 | length 14
  BottomLayer w0.25: LED21.1@54.139,105.4 55.2,105.4 56.667,103.933 LED17.3@67.504,103.933
$$$22: LED1.1 LED4.3 | length 28.7
  BottomLayer w0.25: LED4.3@144.375,86.475 144.375,92.775 138.75,98.4 138.75,101.05 139.748,102.048 145.423,102.048 145.8,102.425 145.8,105.025 145.425,105.4 LED1.1@144.4,105.4
$$$30: LED41.1 LED45.3 | length 14
  BottomLayer w0.25: LED45.3@-50.354,124.475 -49.425,124.475 -47.925,122.975 LED41.1@-36.957,122.975
$$$32: LED49.1 LED53.3 | length 14
  BottomLayer w0.25: LED53.3@-88.347,124.475 -87.35,124.475 -85.85,122.975 LED49.1@-74.957,122.975
$$$33: LED53.1 LED58.3 | length 14
  BottomLayer w0.25: LED58.3@-107.357,124.475 -106.3,124.475 -104.8,122.975 LED53.1@-93.947,122.975
$$$34: LED58.1 LED63.3 | length 21.1
  BottomLayer w0.25: LED63.3@-133.477,124.475 -132.425,124.475 -130.925,122.975 LED58.1@-112.957,122.975
$$$35: LED63.1 LED64.3 | length 30.5
  BottomLayer w0.25: LED64.3@-141.436,141.816 -146.159,141.816 -146.9,141.075 -146.9,125.275 -144.52,122.895 -139.077,122.895 LED63.1@-139.077,122.975
$$$36: LED59.3 LED64.1 | length 18.8
  BottomLayer w0.25: LED64.1@-135.836,143.316 -134.591,143.316 -133.125,141.85 LED59.3@-117.675,141.85
$$$37: LED55.3 LED59.1 | length 14
  BottomLayer w0.25: LED59.1@-112.075,143.45 -110.925,143.45 -109.425,141.95 LED55.3@-98.7,141.95
$$$38: LED50.3 LED55.1 | length 14
  BottomLayer w0.25: LED55.1@-93.1,143.45 -92.025,143.45 -90.558,141.983 LED50.3@-79.733,141.983
$$$39: LED46.3 LED50.1 | length 14
  BottomLayer w0.25: LED50.1@-74.1,143.45 -73.05,143.45 -71.583,141.983 LED46.3@-60.733,141.983
$$$40: LED42.3 LED46.1 | length 14
  BottomLayer w0.25: LED46.1@-55.1,143.45 -54.05,143.45 -52.55,141.95 LED42.3@-41.675,141.95
$$$41: LED37.3 LED42.1 | length 14
  BottomLayer w0.25: LED42.1@-36.075,143.45 -35.075,143.45 -33.575,141.95 LED37.3@-22.7,141.95
$$$42: LED33.3 LED37.1 | length 14
  BottomLayer w0.25: LED37.1@-17.1,143.45 -15.975,143.45 -14.475,141.95 LED33.3@-3.7,141.95
$$$43: LED29.3 LED33.1 | length 14
  BottomLayer w0.25: LED33.1@1.9,143.45 3.15,143.45 4.65,141.95 LED29.3@15.3,141.95
$$$44: LED25.3 LED29.1 | length 14
  BottomLayer w0.25: LED29.1@20.9,143.45 21.925,143.45 23.392,141.983 LED25.3@34.267,141.983
$$$45: LED20.3 LED25.1 | length 14
  BottomLayer w0.25: LED25.1@39.9,143.45 41.05,143.45 42.517,141.983 LED20.3@53.267,141.983
$$$46: LED15.3 LED20.1 | length 14
  BottomLayer w0.25: LED20.1@58.9,143.45 59.75,143.45 61.217,141.983 LED15.3@72.267,141.983
$$$47: LED12.3 LED15.1 | length 14
  BottomLayer w0.25: LED15.1@77.9,143.45 78.775,143.45 80.275,141.95 LED12.3@91.325,141.95
$$$48: LED7.3 LED12.1 | length 18.7
  BottomLayer w0.25: LED12.1@96.925,143.45 98,143.45 99.467,141.983 LED7.3@115.042,141.983
$$$49: LED8.1 LED13.3 | length 23.5
  BottomLayer w0.25: LED13.3@87.399,162.45 88.4,162.45 89.9,160.95 LED8.1@110.294,160.95
$$$50: LED7.1 LED8.3 | length 40.2
  BottomLayer w0.25: LED8.3@115.894,162.45 117.2,162.45 117.713,161.937 117.713,159.513 117.275,159.075 110.475,159.075 110.175,158.775 110.175,155.478 113.95,151.703 113.95,148.753 114.803,147.9 123.119,147.9 123.775,147.244 123.775,145.275 121.95,143.45 LED7.1@120.675,143.45
$$$51: LED13.1 LED18.3 | length 14
  BottomLayer w0.25: LED18.3@68.389,162.45 69.5,162.45 71,160.95 LED13.1@81.799,160.95
$$$52: LED18.1 LED23.3 | length 14
  BottomLayer w0.25: LED23.3@49.399,162.45 50.4,162.45 51.9,160.95 LED18.1@62.789,160.95
$$$53: LED23.1 LED27.3 | length 14
  BottomLayer w0.25: LED27.3@30.399,162.45 31.475,162.45 32.975,160.95 LED23.1@43.799,160.95
$$$54: LED27.1 LED31.3 | length 14
  BottomLayer w0.25: LED31.3@11.399,162.45 12.275,162.45 13.775,160.95 LED27.1@24.799,160.95
$$$55: LED31.1 LED35.3 | length 14
  BottomLayer w0.25: LED35.3@-7.611,162.45 -6.625,162.45 -5.125,160.95 LED31.1@5.799,160.95
$$$56: LED35.1 LED40.3 | length 14
  BottomLayer w0.25: LED40.3@-26.621,162.45 -25.675,162.45 -24.175,160.95 LED35.1@-13.212,160.95
$$$57: LED40.1 LED44.3 | length 14
  BottomLayer w0.25: LED44.3@-45.616,162.45 -44.525,162.45 -43.025,160.95 LED40.1@-32.221,160.95
$$$58: LED44.1 LED48.3 | length 14
  BottomLayer w0.25: LED48.3@-64.626,162.45 -63.7,162.45 -62.2,160.95 LED44.1@-51.216,160.95
$$$59: LED48.1 LED52.3 | length 14
  BottomLayer w0.25: LED52.3@-83.601,162.45 -82.575,162.45 -81.075,160.95 LED48.1@-70.226,160.95
$$$60: LED52.1 LED57.3 | length 14
  BottomLayer w0.25: LED57.3@-102.601,162.45 -101.75,162.45 -100.25,160.95 LED52.1@-89.201,160.95
$$$61: LED57.1 LED61.3 | length 14
  BottomLayer w0.25: LED61.3@-121.601,162.45 -120.6,162.45 -119.1,160.95 LED57.1@-108.201,160.95
$$$62: LED61.1 LED66.3 | length 14
  BottomLayer w0.25: LED66.3@-140.6,162.45 -139.55,162.45 -138.05,160.95 LED61.1@-127.201,160.95
$$$63: LED2.3 LED66.1 | length 337.1
  TopLayer w0.25: v1(123.125,162.725) 123.125,142.8 v1(124.412,141.513)
  BottomLayer w0.25: LED66.1@-146.2,160.95 -147.25,160.95 -147.325,161.025 -147.325,163.925 -146.825,164.425 -139.772,164.425 -138.047,162.7 -129.425,162.7 -127.55,164.575 -120.697,164.575 -118.172,162.05 -110.825,162.05 -108.475,164.4 -101.525,164.4 -99.175,162.05 -91.7,162.05 -89.325,164.425 -82.372,164.425 -79.997,162.05 -72.85,162.05 -70.325,164.575 -63.6,164.575 -61.075,162.05 -53.925,162.05 -51.55,164.425 -44.422,164.425 -42.047,162.05 -34.75,162.05 -32.4,164.4 -25.822,164.4 -23.472,162.05 -16.45,162.05 -14.1,164.4 -6.247,164.4 -3.897,162.05 2.95,162.05 5.3,164.4 12.453,164.4 14.803,162.05 22.2,162.05 24.45,164.3 31.378,164.3 33.628,162.05 41.4,162.05 43.65,164.3 50.328,164.3 52.578,162.05 59.777,162.05 62.027,164.3 69.553,164.3 71.803,162.05 79.547,162.05 81.947,164.45 88.303,164.45 90.703,162.05 99.175,162.05 102.075,164.95 119.8,164.95 122.025,162.725 v1(123.125,162.725) ; v1(124.412,141.513) 136.337,141.513 136.808,141.983 LED2.3@138.767,141.983
$$$64: 
$$$65: 
$$$66: 
$$$67: 
$$$68: 
$$$69: 
$$$70: 
$$$71: 
$$$72: 
$$$73: 
$$$74: 
$$$75: 
$$$76: 
$$$77: 
$$$78: 
$$$79: 
$$$80: 
$$$81: 
$$$82: 
$$$83: LED2.1 LED3.3 | length 28.3
  BottomLayer w0.25: LED3.3@144.4,124.475 144.4,130.856 138.952,136.303 138.952,138.877 140.123,140.048 145.023,140.048 145.925,140.95 145.925,143.025 145.5,143.45 LED2.1@144.4,143.45
$$$84: 
$$$85: 
$$$86: 
$$$87: LED5.1 LED10.3 | length 14
  BottomLayer w0.25: LED10.3@106.398,86.475 107.425,86.475 108.925,84.975 LED5.1@119.789,84.975
$$$88: 
$$$89: 
$$$90: 
$$$91: 
$$$92: 
$$$93: 
$$$94: 
$$$95: LEDC3.2 R1.2 | length 2.4
  BottomLayer w0.3: LEDC3.2@89.311,86.09 91.513,86.09 R1.2@91.663,85.94
$$$96: LEDC2.2 R3.2 | length 3.4
  BottomLayer w0.3: LEDC2.2@89.565,79.461 89.565,77.635 90.025,77.175 R3.2@90.988,77.175
$$$97: LEDC1.2 R2.2 | length 3.6
  BottomLayer w0.3: LEDC1.2@89.642,73.136 89.642,75.317 89.85,75.525 R2.2@90.988,75.525
$$$98: 
$$$99: 
$$$101: LED60.1 LED65.3 | length 18.5
  BottomLayer w0.25: LED65.3@-138.24,86.31 -136.385,86.31 -135.05,84.975 -120.425,84.975 LED60.1@-120.325,84.875
$$$105: 
$$$106: 
$$$107: 
$$$108: 
$$$109: 
$$$110: 
$$$111: 
$$$129: 
$$$130: 
$$$131: 
$$$132: 
$$$133: 
$$$134: 
$$$135: 
$$$136: 
$$$137: 
$$$138: 
$$$139: 
$$$140: 
$$$141: 
$$$142: 
$$$143: 
$$$144: 
$$$145: 
$$$146: 
$$$147: 
$$$148: 
$$$149: 
$$$150: 
$$$151: 
$$$152: 
$$$153: 
$$$154: 
$$$155: 
$$$156: 
$$$157: 
$$$158: 
$$$159: 
$$$160: 
$$$161: 
$$$162: 
$$$163: 
$$$164: 
$$$165: 
$$$166: 
$$$167: 
$$$168: 
$$$169: 
$$$170: 
$$$171: 
$$$172: 
$$$173: 
$$$174: 
$$$175: 
$$$176: 
$$$177: 
$$$178: 
$$$179: 
$$$180: 
$$$181: 
$$$2632: 
$$$2901: 
$$$3113: 
$$$3116: 
$$$3206: 
$$$3234: 
$$$3236: 
$$$3237: 
$$$3239: 
$$$3242: 
$$$3244: 
$$$3245: 
$$$3247: 
$$$4971: 
$$$4990: 
$$$5075: 
$$$5092: 
$$$5104: 
$$$5124: 
$$$13909: CON1.3 R9.1 | length 51.4
  BottomLayer w0.25: CON1.3@-116.275,99.1 -116.675,98.7 -116.675,90.657 -116.093,90.075 -85.788,90.075 -84.85,89.137 -81.05,89.137 -81.041,89.127 -79.895,89.127 -79.125,88.357 -79.125,86.282 -78.918,86.075 -77.614,86.075 R9.1@-77.179,86.51
$$$13911: CON1.2 R8.1 | length 52.2
  BottomLayer w0.25: CON1.2@-117.525,99.1 -117.175,98.75 -117.175,90.45 -116.3,89.575 -85.995,89.575 -85.048,88.627 -80.102,88.627 -79.625,88.15 -79.625,86.075 -79.125,85.575 -77.564,85.575 R8.1@-77.179,85.19
$$$14186: 
$$$14286: 
$$$14464: 
$$$14520: 
$$$14521: 
$$$14847: 
$$$14851: 
$$$15053: 
$$$15177: 
$$$15181: 
$$$15183: 
$$$15632: 
$$$15638: 
$$$15674: 
$$$16181: C11.1 U2.7 | length 4.8
  BottomLayer w0.25: U2.7@-58.855,83.44 -57.34,83.44 -55.975,82.075 -55.975,81.7 -55.775,81.5 C11.1@-55.112,81.5
$$$16741: 
$$$16744: 
$$$17147: 
$$$17213: 
$$$17320: 
$$$17414: 
$$$17419: 
$$$18346: 
$$$18514: 
$$$18719: 
$$$18722: 
$$$18729: 
$$$18811: 
$$$18832: 
$$$18840: 
$$$18861: 
$$$18873: 
$$$18884: 
$$$18894: 
$$$18910: 
$$$18933: 
$$$18943: 
$$$18953: 
$$$18968: 
$$$18979: 
$$$18989: 
$$$18998: 
$$$19007: 
$$$19016: 
$$$19027: 
$$$19109: 
$$$19508: 
$$$19515: 
$$$19694: 
$$$19695: 
$$$19720: 
$$$19721: 
$$$19730: 
$$$19731: 
$$$19738: 
$$$19739: 
$$$19740: 
$$$19741: 
$$$19744: 
$$$19745: 
$$$19747: 
$$$19748: 
$$$19972: 
$$$19994: 
$$$19996: 
$$$20367: 
$$$20368: 
$$$20369: 
$$$20383: 
$$$20384: LED54.3 R14.2 | length 6.1
  BottomLayer w0.25: LED54.3@-90.825,86.3 -88.865,86.3 -88.6,86.035 -88.6,84.317 -89.354,83.563 R14.2@-89.354,82.625
$$$20385: 
$$$20457: 
$$$20458: 
$$$20459: 
$$$20460: 
$$$20461: 
$$$20462: 
$$$20463: 
$$$20464: 
$$$20465: 
$$$22095: 
$$$22240: 
$$$22395: 
$$$22637: 
$$$22638: 
$$$22639: LED21.3 LED26.1 | length 14
  BottomLayer w0.25: LED26.1@35.15,105.4 36.275,105.4 37.742,103.933 LED21.3@48.506,103.933
$$$22640: 
$$$22641: 
$$$22642: 
$$$22643: 
$$$22644: 
$$$22645: 
$$$22646: 
$$$22647: 
$$$22648: 
$$$22649: 
$$$22650: 
$$$22651: 
$$$22652: 
$$$22653: 
$$$22654: 
$$$22655: 
$$$22715: C10.2 U2.6 Y1.1 | length 5.2
  BottomLayer w0.25: U2.6@-58.855,83.94 -55.66,83.94 Y1.1@-55.3,84.3 -55.3,83.113 C10.2@-55.087,82.9
$$$22752: C13.2 U2.5 Y1.2 | length 8.2
  BottomLayer w0.25: U2.5@-58.855,84.44 -57.26,84.44 -56.785,84.44 -55.824,85.401 ; -55.45,85.401 -55.824,85.401 ; C13.2@-53.763,87.875 -53.763,85.637 -53.999,85.401 -55.824,85.401
$$$22908: 
$$$22909: 
$$$22911: 
$$$22961: 
$$$22962: 
$$$22963: 
$$$23109: 
$$$23110: 
$$$23111: 
$$$23112: 
$$$23113: 
$$$23114: 
$$$23115: 
$$$23116: 
$$$23117: 
$$$23118: 
$$$23119: 
$$$23120: 
$$$23121: 
$$$23122: 
$$$23123: 
$$$23124: 
$$$23125: 
$$$23136: 
$$$23137: 
$$$23138: 
$$$23139: 
$$$23140: 
$$$23141: 
$$$23142: 
$$$23143: 
$$$23144: 
$$$23145: 
$$$23146: 
$$$23147: 
$$$23148: 
$$$23149: 
$$$23150: 
$$$23151: 
$$$23152: 
$$$23156: 
$$$23157: 
$$$23158: 
$$$23159: 
$$$23160: 
$$$23161: 
$$$23162: 
$$$23163: LED4.1 LED5.3 | length 14
  BottomLayer w0.25: LED5.3@125.389,86.475 126.65,86.475 128.15,84.975 LED4.1@138.775,84.975
$$$23164: 
$$$23165: 
$$$23166: 
$$$23167: 
$$$23168: 
$$$23169: 
$$$23176: 
$$$23177: 
$$$23178: 
$$$23179: 
$$$23180: 
$$$23181: LED39.3 LED43.1 | length 14
  BottomLayer w0.25: LED43.1@-40.85,105.425 -39.875,105.425 -38.35,103.9 LED39.3@-27.475,103.9
$$$23182: 
$$$23183: 
$$$23184: 
$$$23185: 
$$$23186: 
$$$23187: 
$$$23189: 
$$$23196: 
$$$23197: 
$$$23198: 
$$$23202: 
$$$23206: 
$$$23207: 
$$$23208: 
$$$23209: 
$$$23210: 
$$$23211: 
$$$23212: 
$$$23876: 
$$$23877: 
$$$23985: 
$$$23986: 
$$$27078: Q1.3 R10.1 R11.1 | length 4.1
  BottomLayer w0.25: Q1.3@-81.267,82.1 -80.167,82.1 -79.797,82.47 R10.1@-77.279,82.47
$$$27445: Q1.1 R12.1 R13.2 | length 3.2
  BottomLayer w0.25: Q1.1@-82.217,84.1 -82.079,84.238 R12.1@-82.079,87.25
$$$29160: 
$$$29184: 
$$$30443: R4.1 SW2.2 U2.60 | length 99.9
  TopLayer w0.25: v1(11.475,84.95) 11.475,84.075 11.767,83.783 SW2.2@12.686,83.783
  BottomLayer w0.25: U2.60@-62.68,88.24 -62.68,89.47 -60.925,91.225 -53.651,91.225 -50.529,88.102 -50.529,80.853 -48.329,78.654 -37.421,78.654 -35.95,80.125 -33.05,80.125 -32.375,80.8 -32.375,86.821 -29.671,89.525 -18.422,89.525 -16.322,87.425 11.838,87.425 R4.1@12.063,87.2 ; v1(11.475,84.95) 12.25,85.725 12.25,86.8 R4.1@11.956,87.094
+5V: C21.2 C22.2 C24.1 CON1.4 R15.1 U3.3 | length 93.8
  TopLayer w0.6: v1(-115.675,106.425) v1@-115.675,106.375 ; v1(-114.975,95.275) v1(-114.975,95.875) v1(-114.975,96.575) v1(-114.975,97.2) v1@-114.975,104.875 ; v1@-116.375,106.175 -115.15,104.95 v1(-115.05,104.95) ; v1@-116.375,106.175 -115.75,106.175 ; v1@-116.375,106.175 -116.475,106.275 v1(-116.475,106.375) v1@-115.675,106.375 ; -115.75,106.175 -115.272,105.697 v1(-114.975,105.697) ; -115.75,106.175 v1@-115.675,106.25 ; v1@-115.675,106.25 v1@-115.55,106.375 ; v1@-115.675,106.25 v1@-115.675,106.375 ; v1@-115.675,106.375 v1@-115.55,106.375 ; v1@-115.55,106.375 v1(-114.925,106.375) -114.975,106.325 v1(-114.975,105.697) ; v1(-115.05,104.95) v1@-114.975,104.875 ; v1(-115.05,104.95) -115.05,105.622 v1(-114.975,105.697) ; v1@-114.975,104.875 v1(-114.975,105.697)
  BottomLayer w0.5: CON1.4@-115.006,98.841 -115.006,92.281 -114.275,91.55 -80,91.55 -79.62,91.17 U3.3@-79.62,90.58
  BottomLayer w0.6: R15.1@-139.658,106.135 -139.658,106.967 -139.225,107.4 -132.1,107.4 ; C24.1@-131.678,109.175 -131.678,107.822 -132.1,107.4 ; v1(-114.975,105.697) -115.197,105.697 -115.675,106.175 ; -132.1,107.4 -126.45,107.4 -125.425,106.375 v1(-116.475,106.375) ; v1(-116.475,106.375) v1(-115.05,104.95) -114.925,105.075 v1(-114.925,106.375) v1@-115.475,106.375 ; v1(-116.475,106.375) v1@-115.875,106.375 ; v1@-115.875,106.375 v1@-115.475,106.375 ; v1@-115.875,106.375 -115.675,106.175 ; -115.675,106.175 v1@-115.475,106.375
  other v1: -115.762,105.663
+5VA: 
A1: 
ADC: 
B+: 
BAT: 
BAT+: 
BB1: 
BFB: 
BSW: 
BT: 
BT1: 
BT2: 
BT3: 
BT_EN: 
BT_LED1: 
BT_LED2: 
BT_LED3: 
C00: 
C0: S1.1 S2.1 S3.1 S4.1 S5.1 U2.40 | length 186.2
  TopLayer w0.25: v1(-133.1,153.775) -133.1,145.275 ; -132.738,144.913 -133.1,145.275 ; v1(-128.241,77.825) -128.241,86.423 -122.525,92.139 v1(-122.525,96.859) -122.525,104.4 -126.9,108.775 v1(-126.9,110.425) v1(-126.9,115.85) -126.9,127.325 -129.362,129.788 v1(-129.362,134.875) -129.362,141.537 -133.1,145.275 ; v1(-91.225,110.375) -91.225,106.182 -90.35,105.307 -90.35,97.6 -90.625,97.325 -90.625,92.086 -86.771,88.232 v1(-86.771,87.05)
  BottomLayer w0.25: S1.1@-136.416,153.111 -136.307,153.111 -136.299,153.103 -136.166,153.103 -136.166,153.096 -135.376,153.096 -135.376,153.8 -134.275,153.8 -133.125,153.8 v1(-133.1,153.775) ; S2.1@-134.037,77.111 -133.928,77.111 -133.92,77.103 -133.787,77.103 -133.787,77.096 -132.997,77.096 -132.997,77.825 v1(-128.241,77.825) ; S3.1@-131.671,134.086 -131.563,134.086 -131.554,134.078 -131.421,134.078 -131.421,134.071 -130.631,134.071 -130.631,134.875 v1(-129.362,134.875) ; S4.1@-129.287,115.086 -129.178,115.086 -129.17,115.077 -129.037,115.077 -129.037,115.07 -128.247,115.07 -128.247,115.85 v1(-126.9,115.85) ; v1(-126.9,110.425) -91.275,110.425 v1(-91.225,110.375) ; S5.1@-124.543,96.085 -124.435,96.085 -124.426,96.077 -124.293,96.077 -124.293,96.07 -123.503,96.07 -123.503,96.859 v1(-122.525,96.859) ; v1(-86.771,87.05) -86.775,87.046 -86.775,84.382 -82.493,80.1 -75.212,80.1 -72.872,82.44 -72.675,82.44 U2.40@-69.98,82.44
C01: 
C1: S6.2 S7.2 S8.2 S9.1 S11.1 U2.39 | length 190.2
  TopLayer w0.25: v1(-132.4,151.3) -132.4,145.35 -128.65,141.6 v1(-128.65,132.25) -128.65,130.25 -126.275,127.875 v1(-126.275,109.175) ; v1(-125.45,75.275) -125.45,85.775 -119.775,91.45 v1(-119.775,109.125) ; v1(-101.05,109.125) -101.05,115.8 v1(-101.025,115.825) ; v1(-92,109.125) -92,106.25 -91,105.25 v1@-91,98 ; v1(-90.975,98) -91.125,97.85 -91.125,91.879 -87.4,88.154 v1(-87.4,86.475)
  BottomLayer w0.25: v1(-132.4,151.3) -131.147,151.3 -131.147,150.528 -130.356,150.528 -130.356,150.535 -130.224,150.535 -130.215,150.543 S6.2@-130.106,150.543 ; v1(-128.65,132.25) -121.644,132.25 -121.644,131.531 -120.854,131.531 -120.854,131.538 -120.721,131.538 -120.713,131.546 S8.2@-120.604,131.546 ; v1(-126.275,109.175) -119.825,109.175 v1(-119.775,109.125) v1(-101.05,109.125) v1(-92,109.125) ; v1(-125.45,75.275) -124.01,75.275 -124.01,74.556 -123.22,74.556 -123.22,74.563 -123.087,74.563 -123.078,74.571 S7.2@-122.97,74.571 ; S9.1@-103.167,115.088 -103.058,115.088 -103.05,115.079 -102.917,115.079 -102.917,115.072 -102.127,115.072 -102.127,115.825 v1(-101.025,115.825) ; S11.1@-93.667,96.888 -92.087,96.888 v1(-90.975,98) ; v1(-87.4,86.475) -87.4,84.3 -82.7,79.6 -75.005,79.6 -72.665,81.94 U2.39@-69.98,81.94
C02: 